# Altium PCB PCB.PcbDoc (part 3 of 4)
Units mm, origin at the board's own origin, x right, y up, seen from the top; angles counter-clockwise.
Board outline 147.57 x 62.6 mm, 4 copper layers (Top Layer, Layer 1, Layer 2, Bottom Layer), stack 1.586 mm thick; 192 components, 139 nets, 594 pads, 161 vias.
Unrouted connection lines stored in the file: 1.
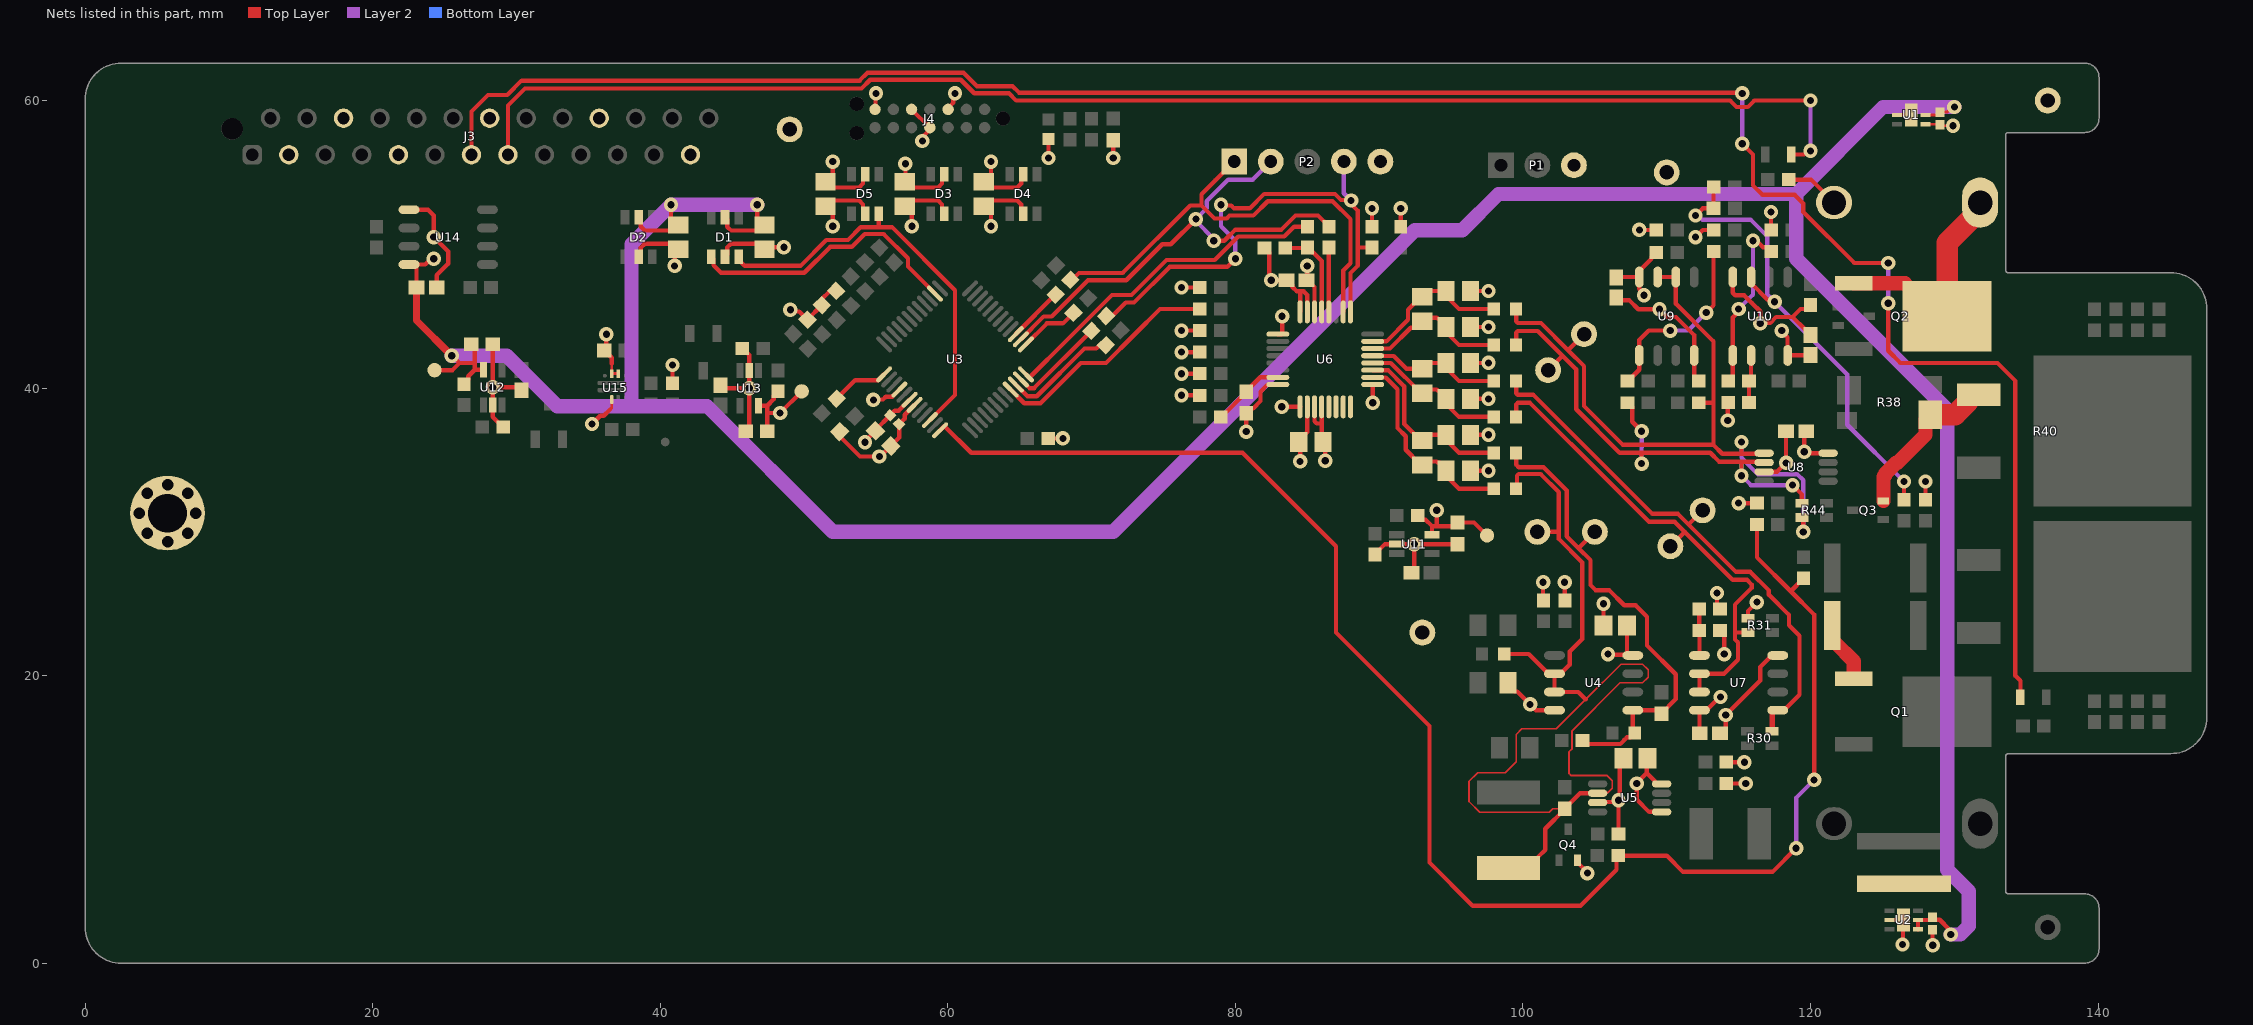
[diagram p4: the nets of this part, all layers, seen from the top]

## Via types
v1: diameter 1, hole 0.5, Top Layer to Bottom Layer, tented both sides, 153 vias
v2: diameter 0.8, hole 0.8, Top Layer to Bottom Layer, tented both sides, 8 vias

## Nets (pads, with @x,y where several pads share a name; then routed paths per layer and width w, separated by ;. In a path a pad name is that pad's centre, name@x,y a point inside that pad or via, vN(x,y) a via of type N, cw(c..) or ccw(c..) an arc to the next point about the centre after c; other vN are vias at no path point) (continued)
GND: (continued)
  Top Layer w0.3: U14.5@22.525,52.405 23.845,52.405 24.25,52 v1(24.25,50.5) 25.25,49.5 25.25,48.656 24.45,47.856 C40.2@24.45,47 ; C35.2@28.6,43.05 28.35,42.8 v1(28.35,40.05) ; R73.2@28.825,37.3 28.825,37.525 28.35,38 U12.2@28.35,38.825 v1(28.35,40.05) ; C32.2@30.35,39.85 30.15,40.05 v1(28.35,40.05) ; v1(35.25,37.5) 35.822,38.072 36.069,38.072 36.507,38.51 ; C41.2@36.1,42.61 C41.2@36.117,42.61 ; v1(36.25,43.75) 36.25,42.743 C41.2@36.117,42.61 ; 36.625,41.71 36.625,42.11 36.125,42.61 C41.2@36.117,42.61 ; D2.2@38.5,49.125 38.65,49.275 38.65,49.775 38.917,50.042 40.858,50.042 C27.1@41.25,49.65 41,49.4 v1(41,48.5) ; R89.2@40.85,40.335 v1(40.85,41.61) ; C33.2@44.185,40.195 44.385,39.995 v1(46.185,39.995) ; D1.2@44.5,49.125 44.65,49.275 44.65,49.775 44.917,50.042 46.858,50.042 C26.1@47.25,49.65 47.4,49.8 v1(48.6,49.8) ; R75.2@45.71,42.745 45.735,42.745 46.185,42.295 U13.2@46.185,41.22 v1(46.185,39.995) ; C36.2@45.935,36.995 46.185,37.245 v1(46.185,39.995) ; v1(52,55.75) 52,54.8 51.55,54.35 C30.1@51.5,54.35 51.892,53.958 53.833,53.958 54.1,54.225 54.1,54.725 D5.2@54.25,54.875 ; C38.2@52.47,36.97 52.47,36.667 53.895,35.242 v1(55.238,35.242) 55.302,35.242 C37.2@56.03,35.97 56.625,36.565 56.625,37.475 C3.2@56.611,37.489 57,37.878 57,38.146 U3.7@57.689,38.836 ; J4.7@54.94,59.385 54.97,59.415 54.97,60.47 v1(55,60.5) ; v1(57.05,55.6) 57.05,54.4 C28.1@57,54.35 57.392,53.958 59.333,53.958 59.6,54.225 59.6,54.725 D3.2@59.75,54.875 ; J4.5@57.48,59.385 J4.11@58.75,58.115 58.75,57.982 58.367,57.599 58.367,57.321 v1(58.233,57.187) ; v1(63,55.75) 63,54.8 62.55,54.35 C29.1@62.5,54.35 62.892,53.958 64.833,53.958 65.1,54.225 65.1,54.725 D4.2@65.25,54.875 ; R97.2@66.975,36.5 v1(68,36.5) ; v1(67,56) DS2.K@67,57.325 ; v1(71.5,56) DS1.K@71.5,57.25 ; v1(76.25,39.5) R26.2@77.525,39.5 ; v1(76.25,41) R27.2@77.525,41 ; v1(76.25,42.5) R28.2@77.525,42.5 ; v1(76.25,44) R29.2@77.525,44 ; v1(80.75,36.975) 80.75,38.275 81.075,38.6 81.192,38.6 81.252,38.6 81.75,39.098 81.75,39.75 82.24,40.24 82.94,40.24 U6.24@82.95,40.25 ; U6.17@82.95,43.75 83.227,43.75 83.25,43.773 v1(83.25,45) ; v1(83.225,38.7) U6.25@84.5,38.7 ; v1(85,48.5) 85,47.55 C10.2@84.95,47.5 85.025,47.5 85.5,47.025 U6.14@85.5,45.3 ; U6.27@85.5,38.7 85.5,37.7 85.661,37.539 85.889,37.539 86,37.65 ; U6.28@86,38.7 86,37.65 ; v1(86.25,34.95) 86.25,36.1 C11.2@86.1,36.25 86,36.35 86,37.65 ; R16.2@89.5,51.225 v1(89.5,52.5) ; v1(89.55,38.975) U6.1@89.55,40.25 ; R71.2@89.7,28.675 89.925,28.675 90.4,29.15 v1(92.45,29.15) ; R15.2@91.5,51.225 v1(91.5,52.5) ; C31.2@92.25,27.15 92.45,27.35 v1(92.45,29.15) ; C34.2@95.45,28.9 95.2,29.15 v1(92.45,29.15) ; C14.2@96.35,34.25 v1(97.6,34.25) ; C16.1@96.35,36.75 v1(97.6,36.75) ; C23.2@96.35,39.25 v1(97.6,39.25) ; C25.1@96.35,41.75 v1(97.6,41.75) ; C17.2@96.35,44.25 v1(97.6,44.25) ; C19.1@96.35,46.75 v1(97.6,46.75) ; v1(101.4,26.5) 101.4,25.242 R10.2@101.417,25.225 ; Q4.2@103.798,7.159 103.798,7.009 104.478,6.329 v1(104.478,6.265) ; v1(105.917,21.5) 105.965,21.452 U4.4@107.333,21.452 ; C21.2@106.5,46.3 106.75,46.05 106.799,46.099 107.401,46.099 108.021,45.479 v1(109.495,45.479) 110.024,44.95 110.644,44.95 111.905,43.689 U9.4@111.905,42.275 111.905,40.779 112.205,40.479 R48.1@112.22,40.479 ; C4.1@107.242,23.5 107.242,21.544 U4.4@107.333,21.452 ; v1(107.917,12.5) 107.917,11.383 108.775,10.525 U5.1@109.642,10.525 ; v1@107.917,12.524 108.614,13.22 ; v1(108.1,51) R43.2@109.275,51 ; C6.1@108.657,14.253 108.614,14.21 108.614,13.22 ; U5.4@109.337,12.496 109.251,12.496 109.179,12.567 109.179,12.654 108.614,13.22 ; v1(112,50.5) 112.004,50.5 112.504,51 R54.1@113.275,51 ; v1(113.5,25.75) 113.5,24.84 R35.2@113.706,24.634 ; C13.2@113.7,16 113.775,16 114.1,16.325 v1(114.1,17.265) 116.5,19.665 116.5,20.605 117.3,21.405 U7.4@117.725,21.405 ; R8.2@114.142,14 114.159,13.984 v1(115.398,13.984) ; v1(114.25,37.75) 114.25,38.975 R50.1@114.275,39 ; v1(115,32) R41.2@116.275,32 ; R31.3@115.65,24 115.65,24.497 v1(116.269,25.116) ; v1(117.25,52.25) 117.25,51.025 R53.1@117.275,51 ; v1(118,44) 118,43.938 118.405,43.533 U10.4@118.405,42.275 119.975,42.275 C22.2@120,42.3 ; R86.1@118.475,54.5 120.035,54.5 J2.1B@121.635,52.9 ; C20.2@119.7,37 119.57,36.87 v1(119.57,35.57) 119.664,35.475 U8.4@121.225,35.475 ; U2.2@125.48,3.008 U2.7@126.475,3.008 126.437,2.971 126.437,1.337 v1(126.4,1.3) ; R94.2@128,32.225 v1(128,33.5) ; C2.2@128.475,2.318 128.487,2.305 128.487,1.263 v1(128.5,1.25) ; U4.4@107.333,21.452 107.595,21.452 U4.4@107.642,21.405 107.381,21.405 U4.4@107.333,21.452
  Top Layer w1: Q2.1@123,47.28 126.57,47.28 128.85,45 Q2.4@129.5,45
  Top Layer w1.5: Q2.4@129.5,45 129.5,50.106 131.795,52.4 J2.1A@131.795,52.9
  other v2: 5.731,29.325 4.334,29.903 7.127,29.903 3.756,31.3 7.706,31.3 4.334,32.697 7.127,32.697 5.731,33.275